# Altium PCB pcbaltium_exmachina.PcbDoc
Units mm, origin at the board's own origin, x right, y up, seen from the top; angles counter-clockwise.
Board outline 138.94 x 89.79 mm, 2 copper layers (Top Layer, Bottom Layer); 20 components, 19 nets, 73 pads, 0 vias.
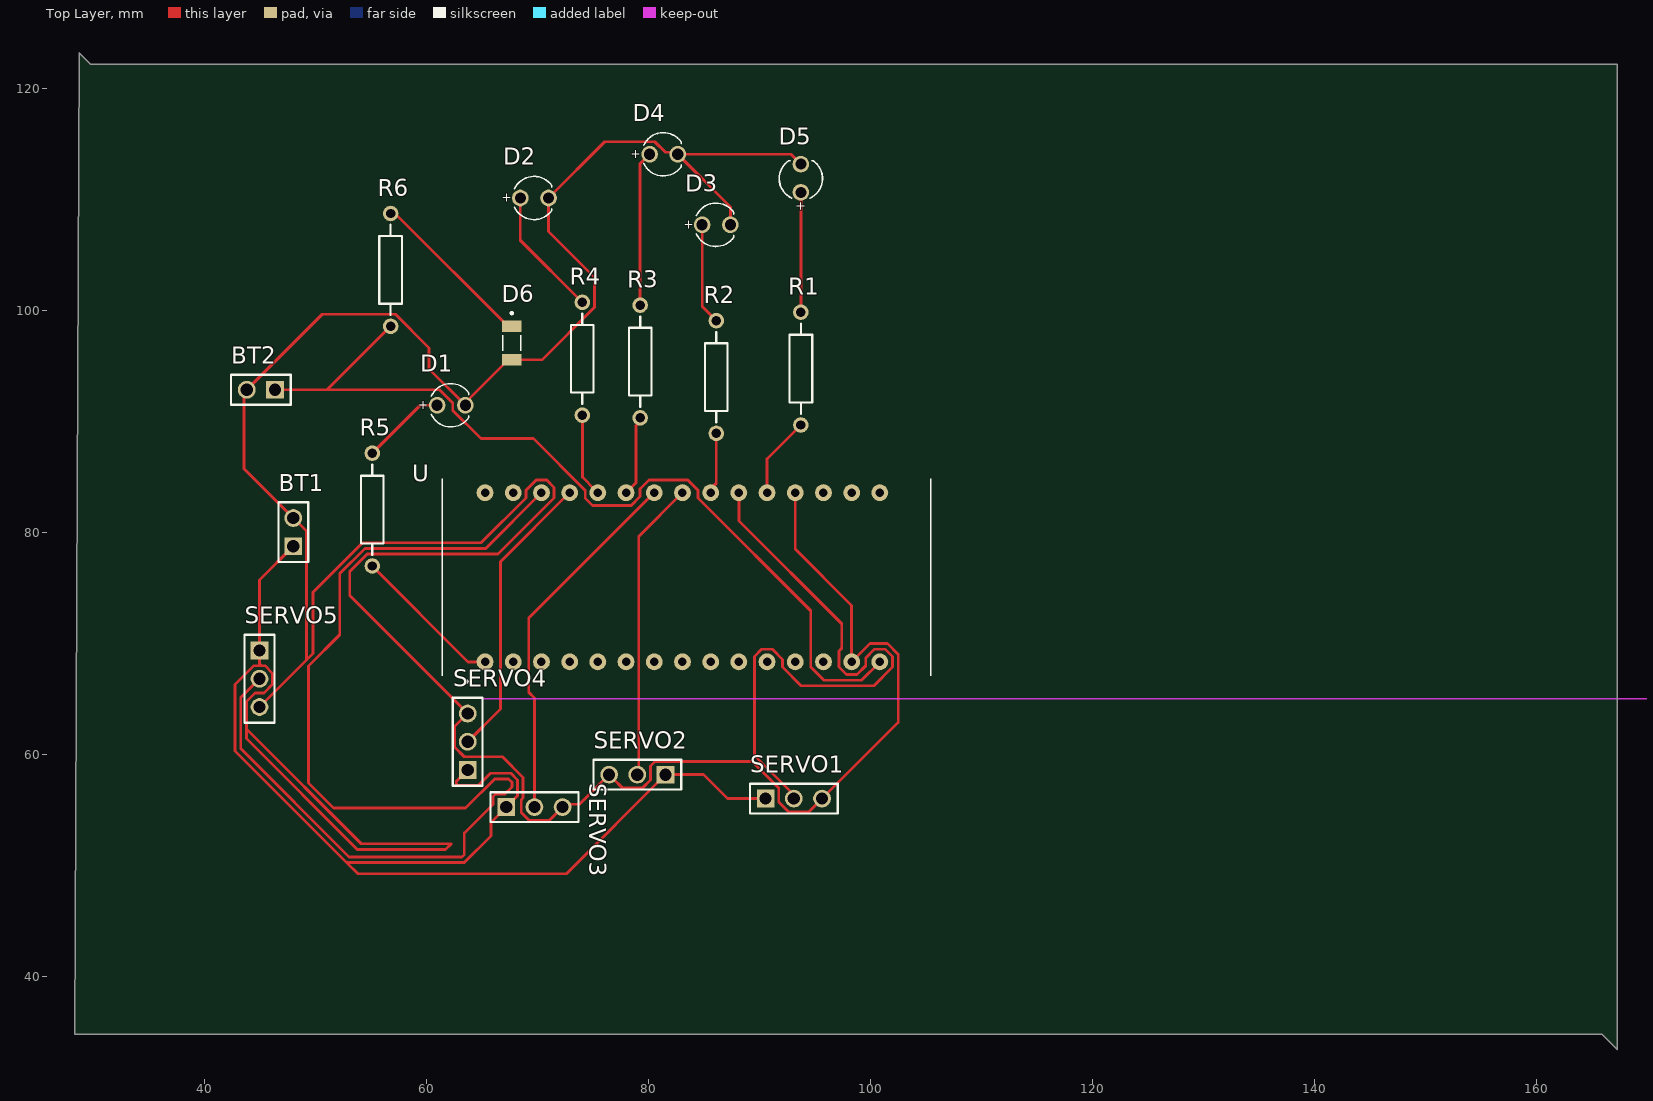
[diagram p0: Top Layer view]
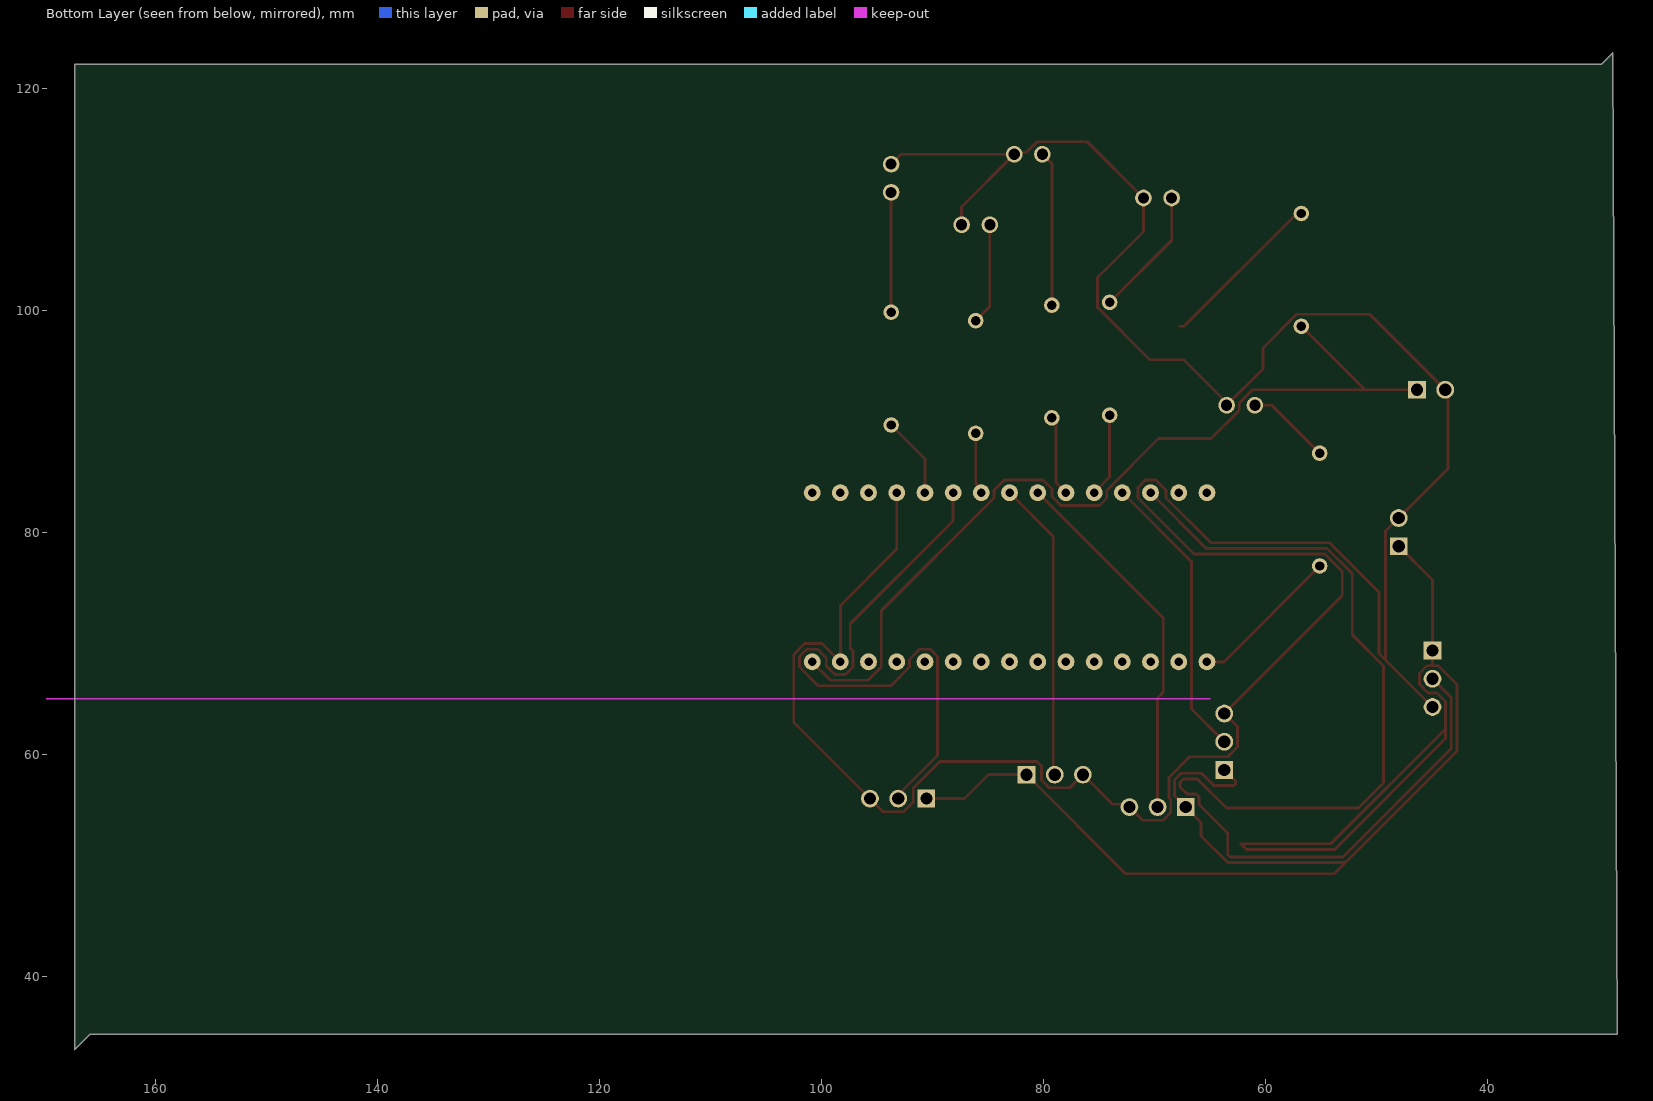
[diagram p1: Bottom Layer view, seen from below]

## Layer stack, top to bottom
Top Solder: solder mask 0.0102, Solder Resist, Dk 3.5
Top Layer: signal copper 0.0356
Dielectric 1: dielectric 0.32, FR-4, Dk 4.8
Bottom Layer: signal copper 0.0356
Bottom Solder: solder mask 0.0102, Solder Resist, Dk 3.5

## Board outline
28.702,123.19 29.718,122.174 167.259,122.174 167.259,33.401 165.862,34.798 28.321,34.798
cut-out: 65,65 202.668,65

## Design rules (kind name [scope] priority, off if disabled: settings)
Clearance [All] p1: gap=0.254 ignorepadtopadclearanceinfootprint=FALSE except(0: Arc-Hole Track-Hole SMDPad-Hole THPad-Hole Via-Hole Fill-Hole Poly-Hole Region-Hole Text-Hole)
PolygonConnect [All] p1: connectstyle=Relief reliefconductorwidth=0.254 reliefentries=4 polygonreliefangle="90 Angle" airgapwidth=0.254
RoomDefinition altium_exmachina [InComponentClass('altium_exmachina')] p1: confinementstyle=ConfineIn formatcopy=TRUE lockcomponents=FALSE outline 136.525,43.307 159.639,43.307 159.639,88.9 136.525,88.9
RoutingVias [All] p1: holewidth=0.711 width=1.27 viastyle="Through Hole" minholewidth=0.711 minwidth=1.27 maxholewidth=0.711 maxwidth=1.27
SolderMaskExpansion [All] p1: expansion=0.102 istentingtop=FALSE
Width [All] p1: maxlimit=0.254 minlimit=0.254 preferedwidth=0.254
30 further rules are at their usual default settings.

## Components (designator, comment, footprint, x,y, rotation, side; value= is the part's Value field where it differs from the comment)
BT1 "61300211121" 61300211121 48.006,80.01 r90 top
BT2 "61300211121" 61300211121 45.085,92.837 r180 top
D1 "Blue, 3.2V, 40deg" "LED Blue 3mm" 62.23,91.44 r0 top
D2 "Blue, 3.2V, 40deg" "LED Blue 3mm" 69.723,110.109 r0 top
D3 "Blue, 3.2V, 40deg" "LED Blue 3mm" 86.106,107.696 r0 top
D4 "Blue, 3.2V, 40deg" "LED Blue 3mm" 81.368,114.046 r0 top
D5 "Blue, 3.2V, 40deg" "LED Blue 3mm" 93.726,111.887 r90 top
D6 "LED_1206_SMD" LEDC3216X120N 67.691,97.042 r270 top
R1 "Res" "RES AXIAL-0.4" 93.726,94.742 r90 top value=180
R2 "Res" "RES AXIAL-0.4" 86.106,93.98 r90 top value=180
R3 "Res" "RES AXIAL-0.4" 79.248,95.377 r90 top value=180
R4 "Res" "RES AXIAL-0.4" 74.041,95.631 r90 top value=180
R5 "Res" "RES AXIAL-0.4" 55.118,82.042 r90 top value=180
R6 "Res" "RES AXIAL-0.4" 56.769,103.632 r90 top value=330
SERVO1 "61300311121" 61300311121 93.091,56.007 r0 top
SERVO2 "61300311121" 61300311121 78.994,58.166 r180 top
SERVO3 "61300311121" 61300311121 69.723,55.245 r0 top
SERVO4 "61300311121" 61300311121 63.714,61.132 r90 top
SERVO5 "61300311121" 61300311121 44.958,66.802 r270 top
U "Arduino Nano 33 BLE Sense" MODULE_ABX00027 83.439,75.946 r0 top

## Footprints (in the part's own frame and the unit in brackets; to place one, negate y for a bottom-side part, rotate by r counter-clockwise, add the part's x,y. Pads: shape width x height; smd on the part's side, far side on the other; paste and mask are expansions set on the pad)
61300211121 [mm] "Pin Header, pitch 2.54 mm, THT, Vertical, single row, 2p"
  rect 1.6x1.6 hole 1.1: 1(-1.27,0)
  round 1.6 hole 1.1: 2(1.27,0)
  silkscreen extent -2.69,-1.35 2.69,1.35, body extent -2.54,-1.27 2.54,1.27, height 8.57
61300311121 [mm] "Pin Header, pitch 2.54 mm, THT, Vertical, single row, 3p"
  rect 1.6x1.6 hole 1.1: 1(-2.54,0)
  round 1.6 hole 1.1: 2(0,0) 3(2.54,0)
  silkscreen extent -3.96,-1.35 3.96,1.35, body extent -3.81,-1.27 3.81,1.27, height 8.57
"LED Blue 3mm" [mm] "THT Mono-color Round Color LED, 2-leads"
  round 1.5 hole 1: 1(1.27,0) 2(-1.27,0)
  silkscreen extent -1.8,-1.95 1.57,1.95, body extent -1.9,-2.06 1.54,1.78, height 5.38
LEDC3216X120N [mm]
  rect 1.01x1.73 smd: NEG(1.51,0) POS(-1.51,0)
  silkscreen extent -2.8,-0.8 0.68,0.8, body extent -1.6,-0.8 1.6,0.8, height 1.2
MODULE_ABX00027 [mil]
  round 60 hole 30: 1(-715,-300) 2(-615,-300) 3(-515,-300) 4(-415,-300) 5(-315,-300) 6(-215,-300) 7(-115,-300) 8(-15,-300) 9(85,-300) 10(185,-300) 11(285,-300) 12(385,-300) 13(485,-300) 14(585,-300) 15(685,-300) 16(685,300) 17(585,300) 18(485,300) 19(385,300) 20(285,300) 21(185,300) 22(85,300) 23(-15,300) 24(-115,300) 25(-215,300) 26(-315,300) 27(-415,300) 28(-515,300) 29(-615,300) 30(-715,300)
  silkscreen extent -866,-374 866,350, body extent -903,-347 835,350, height 108
"RES AXIAL-0.4" [mm] "Axial Device, Thru-Hole; 2 Leads; 0.4 in Pin Spacing"
  round 1.4 hole 0.85: 1(-5.08,0) 2(5.08,0)
  silkscreen extent -4.06,-1.02 4.06,1.02, body extent -5.47,-1.14 5.47,1.4, height 2.72

## Part data
BT1 BT2: "WR-PHD Pin Header, THT, pitch 2.54mm, Single Row, Vertical, 2pin", Contact Resistance=20mOhm, Operating Temperature="-40 to +105degC", Rated Current=3A, Withstanding Voltage=500VAC, Working Voltage=250VAC, ComponentLink1Description=Manufacturer, ComponentLink1URL=http://www.we-online.de, ComponentLink2Description=Datasheet, ComponentLink2URL=https://katalog.we-online.de/em/datasheet/6130xx11121.pdf, Gender=Male, Mounting Technology=THT, Orientation=Vertical, Packaging=Bag, Part Number=61300211121, Pin Number=2, Pitch=2.54mm, Published Date="June 2019", Publisher="Wurth Elektronik", Row Number=Single
D1 D2 D3 D4 D5: library part LED, "LED WL-TMRC THT Mono-color Round", Emitting Color=Blue, Forward Voltage=3.2V, Operating Temperature="-40 to +85degC", Part Number=151051BS04000, Chip Technology=GaN, ComponentLink1Description=Manufacturer, ComponentLink1URL=http://www.we-online.de, ComponentLink2Description=Datasheet, ComponentLink2URL=https://katalog.we-online.de/led/datasheet/151051BS04000.pdf, Dominant Wavelength=470nm, Luminous Intensity=500mcd, Mounting Technology=THT, Packaging=Bulk, Peak Wavelength=465nm, Published Date="October 2019", Publisher="Wurth Elektronik", Size=5mm, Viewing Angle=40deg
D6: "2.6 V Red LED SMD", Package=None, Availability="Not in stock", Check_prices=https://www.snapeda.com/parts/LHN974%20RED%20LED%201206/Osram/view-part/7899607/?ref=eda, MF=Osram, MP="LHN974 RED LED 1206", Price=None, SnapEDA_Link=https://www.snapeda.com/parts/LHN974%20RED%20LED%201206/Osram/view-part/7899607/?ref=snap
R1 R2 R3 R4 R5 R6: "Resistor", LatestRevisionDate=17-Jul-2002, LatestRevisionNote="Re-released for DXP Platform.", PackageDescription="Axial Device, Thru-Hole; 2 Leads; 0.4 in Pin Spacing", PackageReference=AXIAL-0.4, Published=8-Jun-2000, Publisher="Altium Limited"
SERVO1 SERVO2 SERVO3 SERVO4 SERVO5: "WR-PHD Pin Header, THT, pitch 2.54mm, Single Row, Vertical, 3pin", Contact Resistance=20mOhm, Operating Temperature="-40 to +105degC", Rated Current=3A, Withstanding Voltage=500VAC, Working Voltage=250VAC, ComponentLink1Description=Manufacturer, ComponentLink1URL=http://www.we-online.de, ComponentLink2Description=Datasheet, ComponentLink2URL=https://katalog.we-online.de/em/datasheet/6130xx11121.pdf, Gender=Male, Mounting Technology=THT, Orientation=Vertical, Packaging=Bag, Part Number=61300311121, Pin Number=3, Pitch=2.54mm, Published Date="June 2019", Publisher="Wurth Elektronik", Row Number=Single
U: "ATSAMD21G18A Arduino Nano 33 IoT SAM D ARMÂ® CortexÂ®-M0 + MCU Ù‡ÛŒØ", Package=None, Availability=Unavailable, DigiKey-Purchase-URL=https://snapeda.com/shop?store=DigiKey&id=3949339, MF=Arduino, Mouser-Purchase-URL=https://snapeda.com/shop?store=Mouser&id=3949339, MP=ABX00027, Price=None, SnapEDA_Link=https://www.snapeda.com/parts/ABX00027/Arduino/view-part/3949339/?ref=snap

## Nets (pads, with @x,y where several pads share a name; then routed paths per layer and width w, separated by ;. In a path a pad name is that pad's centre, name@x,y a point inside that pad or via, vN(x,y) a via of type N, cw(c..) or ccw(c..) an arc to the next point about the centre after c; other vN are vias at no path point)
GND: BT1.2 BT2.2 D1.1 D2.1 D3.1 D4.1 D5.1 D6.NEG SERVO1.3 SERVO2.3 SERVO3.3 SERVO4.3 SERVO5.3 U.14 U.19 | length 280
  Top Layer w0.254: SERVO5.3 49.187,68.491 ; D3.1 87.376,109.308 D4.1 ; U.19 93.218,78.486 98.298,73.406 U.14 99.949,69.977 101.522,69.977 102.489,69.01 102.489,62.865 SERVO1.3 94.45,54.826 92.602,54.826 91.732,55.696 91.732,56.965 89.35,59.347 80.576,59.347 80.175,58.946 80.175,57.677 79.483,56.985 77.635,56.985 76.835,57.785 76.581,57.785 76.454,57.912 SERVO2.3 73.791,55.503 72.521,55.503 SERVO3.3 71.082,54.064 69.234,54.064 68.542,54.756 68.542,55.886 68.707,56.051 68.707,57.908 66.843,59.773 63.403,59.773 62.533,60.643 62.533,62.491 SERVO4.3 53.086,74.299 53.086,76.459 54.67,78.043 66.451,78.043 71.501,83.093 71.501,84.039 70.831,84.709 69.885,84.709 68.961,83.785 68.961,83.093 64.927,79.059 54.249,79.059 49.786,74.595 49.786,69.09 49.187,68.491 ; D5.1 92.837,114.046 D4.1 ; 49.187,68.491 49.187,80.099 BT1.2 43.561,85.725 43.561,92.583 BT2.2 50.611,99.633 57.217,99.633 60.239,96.611 60.239,94.701 D1.1 63.5,91.701 67.331,95.532 D6.NEG 70.391,95.532 75.122,100.263 75.122,102.953 70.993,107.082 D2.1 76.061,115.177 80.567,115.177 81.507,114.236 82.448,114.236 D4.1
NetBT1_1: BT1.1 SERVO1.1 SERVO2.1 SERVO3.1 SERVO4.1 SERVO5.1 | length 161
  Top Layer w0.254: BT1.1 44.958,75.692 SERVO5.1 44.958,68.161 45.136,67.983 ; SERVO4.1 62.682,57.56 62.682,57.349 62.83,57.2 64.671,57.2 65.763,58.293 67.604,58.293 68.199,57.698 68.199,56.261 SERVO3.1 65.799,53.861 65.799,52.654 63.398,50.254 52.807,50.254 ; SERVO1.1 87.122,56.007 84.963,58.166 SERVO2.1 72.606,49.238 53.823,49.238 52.807,50.254 ; 43.777,62.292 43.777,61.423 53.765,51.435 61.722,51.435 62.23,51.943 54.126,51.943 43.777,62.292 ; 43.777,62.292 43.777,64.751 44.558,65.532 ; 44.558,65.532 45.358,65.532 ; 44.558,65.532 45.358,65.532 ; 45.136,67.983 44.469,67.983 42.761,66.275 42.761,60.3 52.807,50.254 ; 45.136,67.983 45.447,67.983 46.139,67.291 46.139,66.313 45.358,65.532
NetBT2_1: BT2.1 R6.1 U.15 | length 80.6
  Top Layer w0.254: BT2.1 51.054,92.837 ; R6.1 51.054,92.837 ; U.15 99.187,66.675 95.793,66.675 94.615,67.853 94.615,72.933 84.455,83.093 84.455,83.785 83.531,84.709 80.045,84.709 79.248,83.912 79.248,83.22 78.451,82.423 74.965,82.423 74.295,83.093 74.295,83.785 69.642,88.438 64.902,88.438 62.369,90.972 62.369,91.63 61.162,92.837 51.054,92.837
NetD1_2: D1.2 R5.2 | length 7.6
  Top Layer w0.254: R5.2 59.436,91.44 D1.2
NetD2_2: D2.2 R4.2 | length 11.7
  Top Layer w0.254: D2.2 68.453,106.299 R4.2
NetD3_2: D3.2 R2.2 | length 9.2
  Top Layer w0.254: D3.2 84.836,100.33 R2.2
NetD4_2: D4.2 R3.2 | length 13.9
  Top Layer w0.254: R3.2 79.248,113.196 D4.2
NetD5_2: D5.2 R1.2 | length 11.2
  Top Layer w0.254: R1.2 93.726,110.49 D5.2@93.853,110.617 ; D5.2 D5.2@93.853,110.617 ; D5.2@93.98,110.744 D5.2@93.853,110.617
NetD6_POS: D6.POS R6.2 | length 15.1
  Top Layer w0.254: R6.2 56.988,108.493 57.39,108.493 67.331,98.552 D6.POS
NetR1_1: R1.1 U.20 | length 7.4
  Top Layer w0.254: U.20 90.678,86.614 R1.1
NetR2_1: R2.1 U.22 | length 5.5
  Top Layer w0.254: U.22 85.598,83.91 86.106,84.418 R2.1
NetR3_1: R3.1 U.25 | length 7.5
  Top Layer w0.254: U.25 78.867,84.455 78.867,89.606 79.029,89.768 79.029,89.881 78.867,90.043 79.121,90.297 R3.1
NetR4_1: R4.1 U.26 | length 7.7
  Top Layer w0.254: R4.1 74.041,84.963 75.184,83.82 75.438,83.82 U.26
NetR5_1: R5.1 U.1 | length 13.7
  Top Layer w0.254: R5.1 63.754,68.326 U.1
NetSERVO1_2: SERVO1.2 U.21 | length 56.8
  Top Layer w0.254: U.21 88.138,81.025 97.409,71.754 97.409,69.556 97.155,69.302 97.155,67.853 97.825,67.183 98.771,67.183 99.568,67.98 99.568,68.672 100.365,69.469 101.311,69.469 101.981,68.799 101.981,67.853 100.295,66.167 93.761,66.167 92.075,67.853 92.075,68.545 91.151,69.469 90.205,69.469 89.535,68.799 89.535,59.88 93.091,56.324 SERVO1.2
NetSERVO2_2: SERVO2.2 U.23 | length 27.1
  Top Layer w0.254: SERVO2.2 78.994,58.42 79.121,58.547 79.121,79.629 U.23
NetSERVO3_2: SERVO3.2 U.24 | length 33.2
  Top Layer w0.254: SERVO3.2 69.723,65.079 69.215,65.587 69.215,72.263 U.24
NetSERVO4_2: SERVO4.2 U.27 | length 26.2
  Top Layer w0.254: SERVO4.2 66.675,64.093 66.675,77.343 U.27
NetSERVO5_2: SERVO5.2 U.28 | length 101.7
  Top Layer w0.254: SERVO5.2 43.269,65.113 43.269,60.51 53.017,50.762 63.188,50.762 63.411,50.985 63.411,52.901 66.002,55.492 66.002,56.203 66.225,56.426 67.05,56.426 67.691,57.067 67.691,57.487 67.393,57.785 66.147,57.785 63.524,55.162 51.626,55.162 49.365,57.423 49.365,67.951 52.185,70.77 52.185,76.276 54.46,78.551 65.343,78.551 U.28
pads on no net: U.2 U.3 U.4 U.5 U.6 U.7 U.8 U.9 U.10 U.11 U.12 U.13 U.16 U.17 U.18 U.29 U.30

## Text inside footprints (layer, text, board x,y; h text height)
D1: Top Overlay "+" at 59.28,91.09 h0.8
D2: Top Overlay "+" at 66.773,109.759 h0.8
D3: Top Overlay "+" at 83.156,107.346 h0.8
D4: Top Overlay "+" at 78.418,113.696 h0.8
D5: Top Overlay "+" at 94.076,108.937 h0.8 r90